# Altium PCB Led_Light_PCB_Ex02.PcbDoc
Units mil, origin at the board's own origin, x right, y up, seen from the top; angles counter-clockwise.
Board outline 1610.59 x 1610.59 mil, 2 copper layers (Top Layer, Bottom Layer); 25 components, 9 nets, 53 pads, 0 vias.
Unrouted connection lines stored in the file: 3.
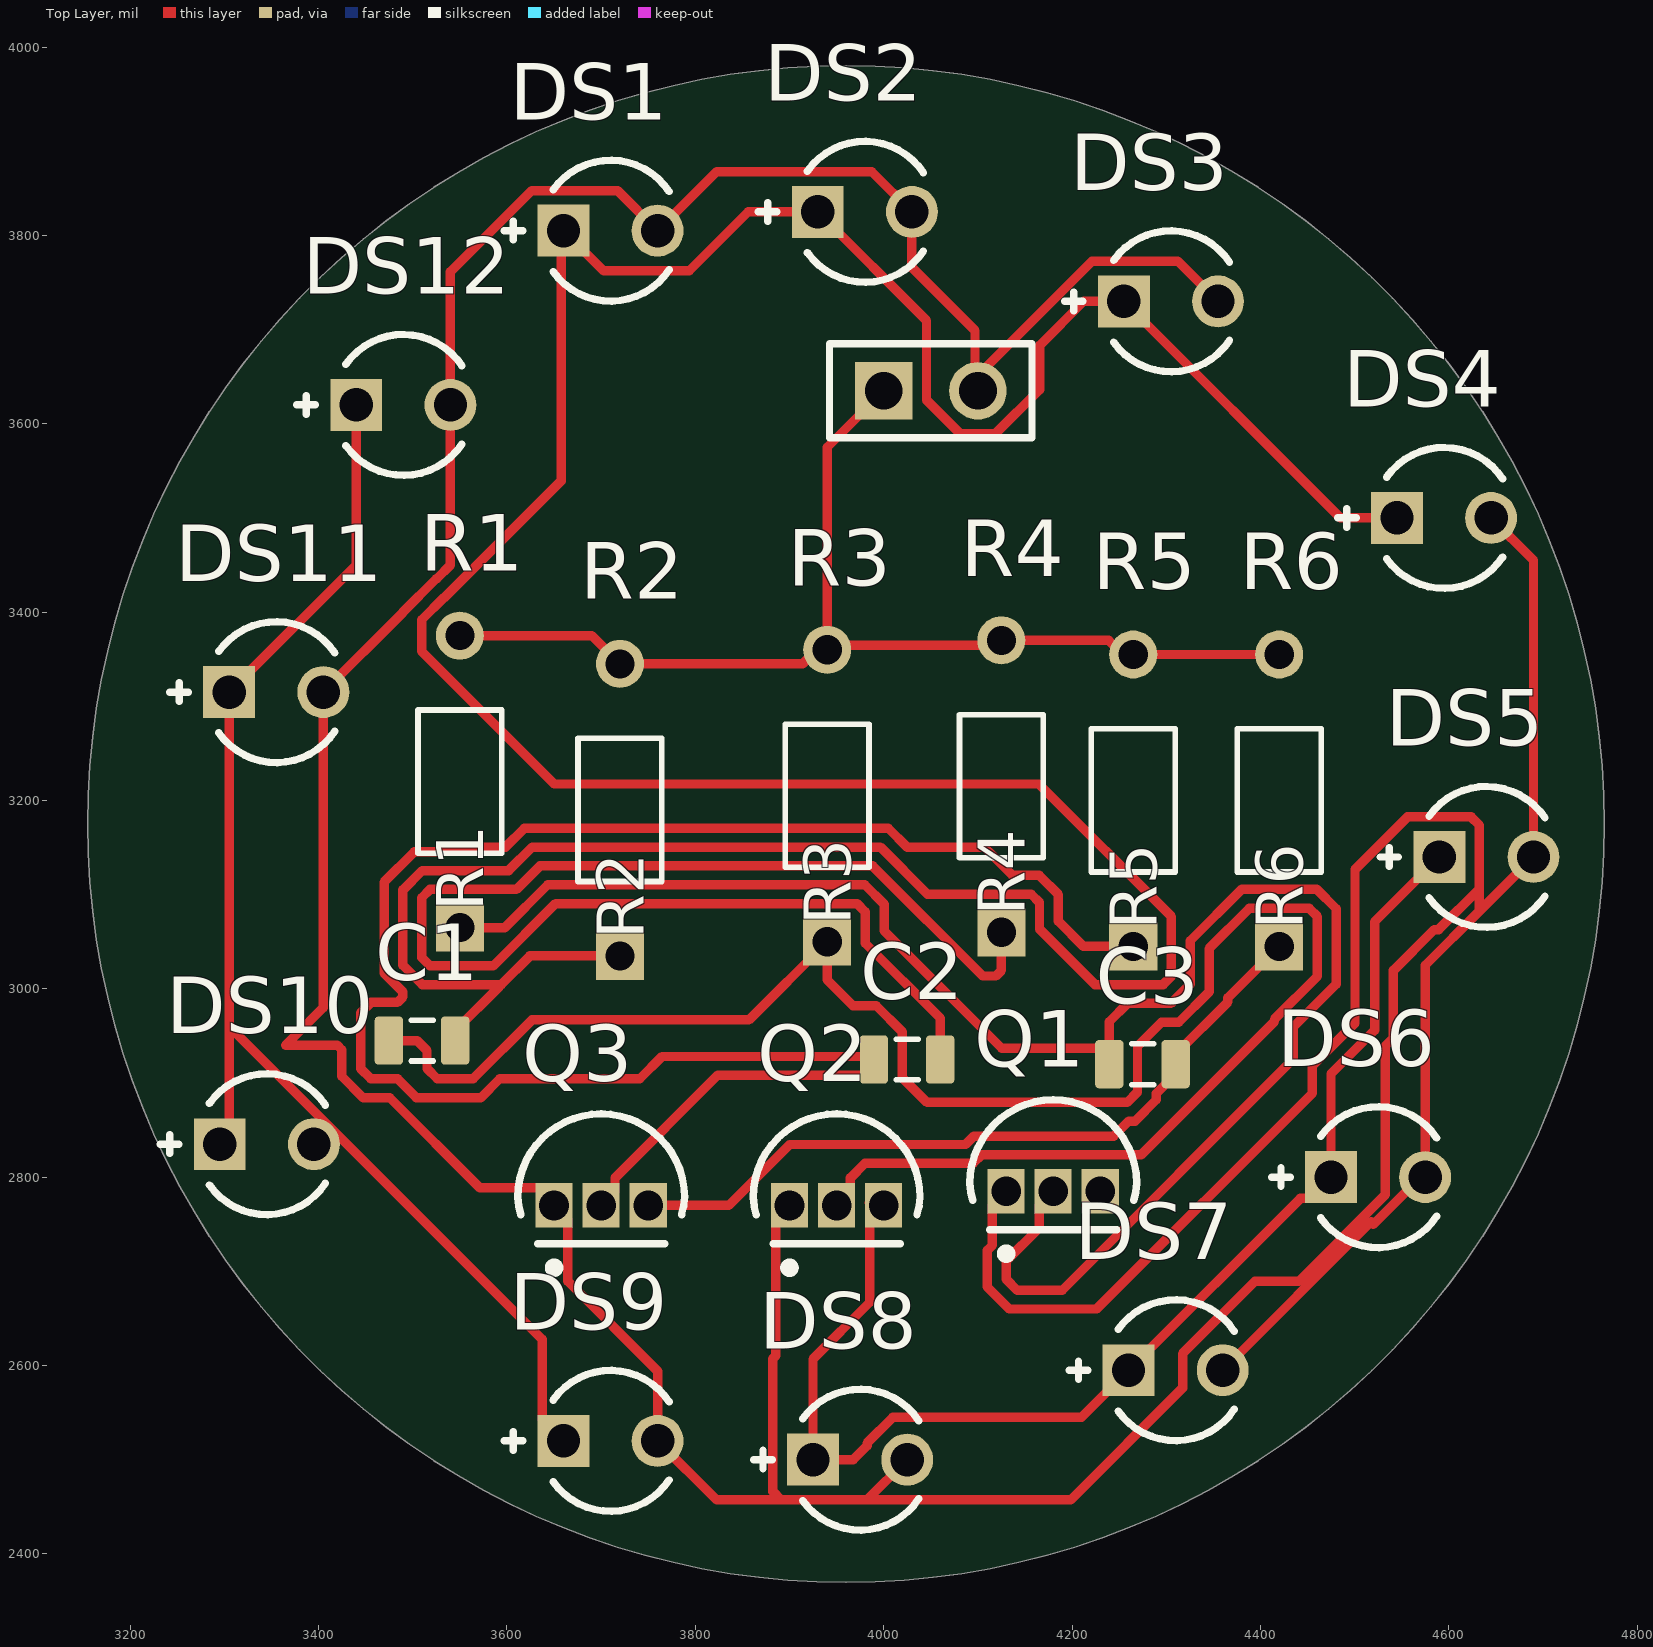
[diagram p0: Top Layer view]
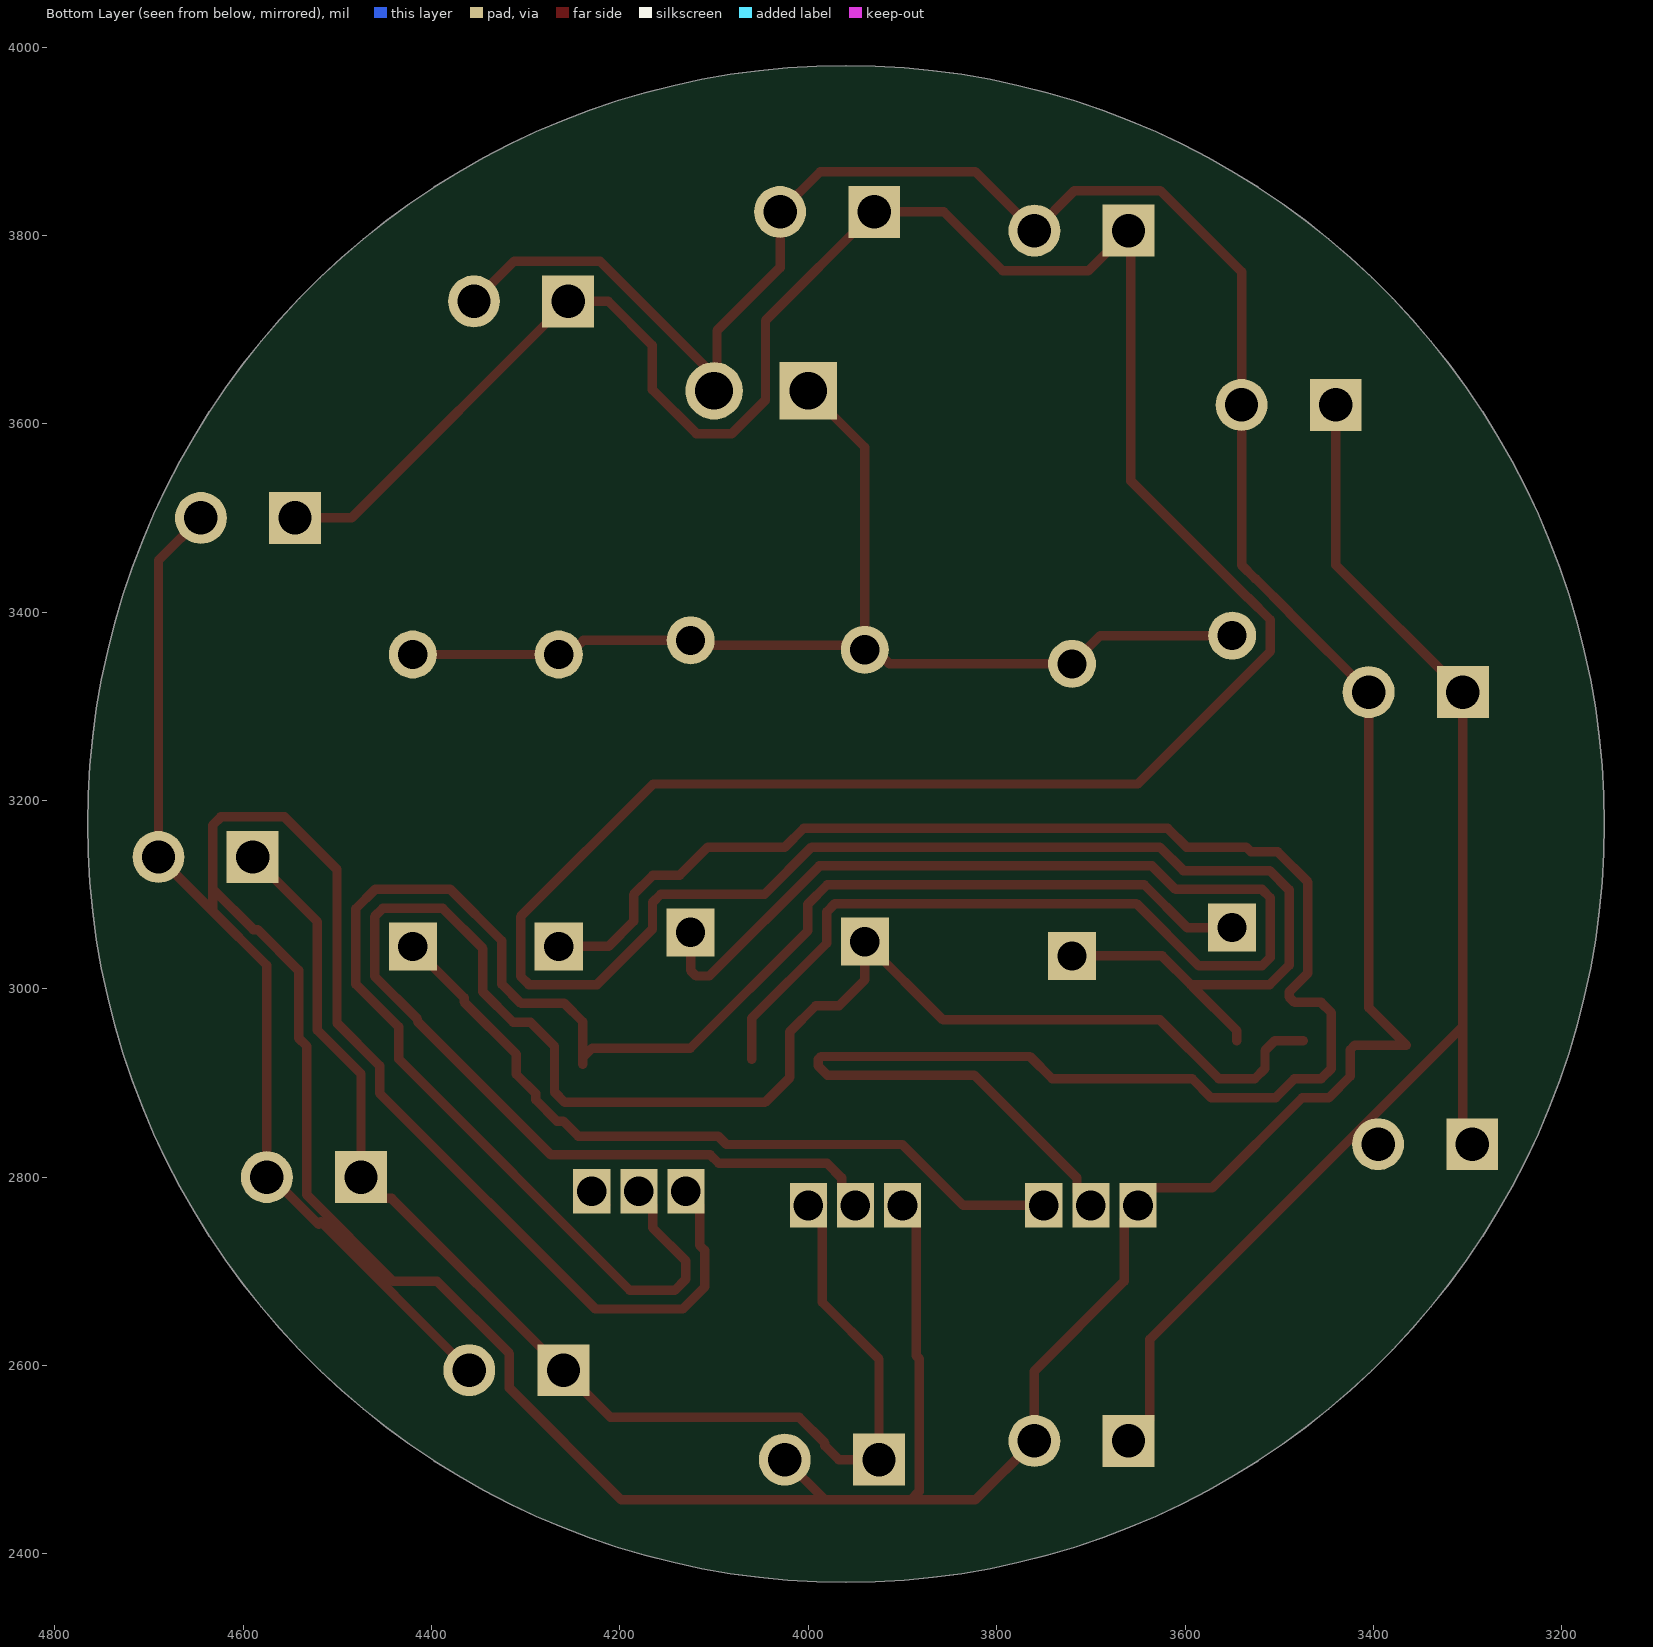
[diagram p1: Bottom Layer view, seen from below]

## Layer stack, top to bottom
Top Solder: solder mask 0.4, Solder Resist, Dk 3.5
Top Layer: signal copper 1.4
Dielectric 1: dielectric 12.6, FR-4, Dk 4.8
Bottom Layer: signal copper 1.4
Bottom Solder: solder mask 0.4, Solder Resist, Dk 3.5

## Board outline
3154.7,3175 ccw(c3960,3175) 3960,2369.7 ccw(c3960,3175) 4765.3,3175 ccw(c3960,3175) 3960,3980.3 ccw(c3960,3175)

## Design rules (kind name [scope] priority, off if disabled: settings)
Clearance [All] p1: gap=10 ignorepadtopadclearanceinfootprint=FALSE
PolygonConnect [All] p1: connectstyle=Relief reliefconductorwidth=10 reliefentries=4 polygonreliefangle="90 Angle" airgapwidth=10
RoutingVias [All] p1: holewidth=28 width=50 viastyle="Through Hole" minholewidth=28 minwidth=50 maxholewidth=28 maxwidth=50
SolderMaskExpansion [All] p1: expansion=0 istentingtop=FALSE
SupplyNets "Schematic Supply Nets" [InNet('GND')] p1: voltage=0.000
Width [All] p1: maxlimit=10 minlimit=10 preferedwidth=10
30 further rules are at their usual default settings.

## Classes and differential pairs
component class "Led Light-Ex01": * C1 C2 C3 DS1 DS2 DS3 DS4 DS5 DS7 DS9 DS10 DS11 DS12 Q1 Q3 R3 R4 R5 R6

## Components (designator, comment, footprint, x,y, rotation, side; value= is the part's Value field where it differs from the comment)
C1 "Capacitor 22µF +/-40% 16V 0805" CAPC0805(2012)145_L 3510,2945 r0 top value=22µF
C2 "Capacitor 22µF +/-40% 16V 0805" CAPC0805(2012)145_L 4025,2925 r0 top value=22µF
C3 "Capacitor 22µF +/-40% 16V 0805" CAPC0805(2012)145_L 4275,2920 r0 top value=22µF
DS1 "LTL-1CHE" INDPR60-254-520X380X650 3710,3805 r0 top
DS2 "LTL-1CHE" INDPR60-254-520X380X650 3980,3825 r0 top
DS3 "LTL-1CHE" INDPR60-254-520X380X650 4305,3730 r0 top
DS4 "LTL-1CHE" INDPR60-254-520X380X650 4595,3500 r0 top
DS5 "LTL-1CHE" INDPR60-254-520X380X650 4640,3140 r0 top
DS6 "LTL-1CHE" INDPR60-254-520X380X650 4525,2800 r0 top
DS7 "LTL-1CHE" INDPR60-254-520X380X650 4310,2595 r0 top
DS8 "LTL-1CHE" INDPR60-254-520X380X650 3975,2500 r0 top
DS9 "LTL-1CHE" INDPR60-254-520X380X650 3710,2520 r0 top
DS10 "LTL-1CHE" INDPR60-254-520X380X650 3345,2835 r0 top
DS11 "LTL-1CHE" INDPR60-254-520X380X650 3355,3315 r0 top
DS12 "LTL-1CHE" INDPR60-254-520X380X650 3490,3620 r0 top
J1 "TSW-102-26-F-S" SMTC-TSW-102-26-XX-S 4000,3635 r0 top
Q1 "S9013" JSCJ-TO-92-3_V 4180,2785 r0 top
Q2 "S9013" JSCJ-TO-92-3_V 3950,2770 r0 top
Q3 "S9013" JSCJ-TO-92-3_V 3700,2770 r0 top
R1 "CF18JT330R" STA_CF18_STP 3550,3065 r90 top value=10k
R2 "CF18JT330R" STA_CF18_STP 3720,3035 r90 top value=330
R3 "CF18JT330R" STA_CF18_STP 3940,3050 r90 top value=10k
R4 "CF18JT330R" STA_CF18_STP 4125,3060 r90 top value=330
R5 "CF18JT330R" STA_CF18_STP 4265,3045 r90 top value=10k
R6 "CF18JT330R" STA_CF18_STP 4420,3045 r90 top value=330

## Footprints (in the part's own frame and the unit in brackets; to place one, negate y for a bottom-side part, rotate by r counter-clockwise, add the part's x,y. Pads: shape width x height; smd on the part's side, far side on the other; paste and mask are expansions set on the pad)
CAPC0805(2012)145_L [mm] "Chip Capacitor, Body 2.0x1.2mm, Height 1.45mm, IPC High Density"
  rrect25% 0.76x1.3 smd: 1(-0.9,0) 2(0.89,0)
  silkscreen extent -0.3,-0.55 0.3,0.55, body extent -1,-0.6 1,0.6, height 1.45
INDPR60-254-520X380X650 [mm] "THD, 2-Leads, Dia 3.8mm, Pitch 2.54mm"
  rect 1.4x1.4 hole 0.9: 1(-1.27,0)
  round 1.4 hole 0.9: 2(1.27,0)
  silkscreen extent -2.87,-1.9 1.58,1.9, body extent -1.9,-1.9 1.9,1.9, height 6.5
JSCJ-TO-92-3_V [mm] "TO-92, 3-leads, Height 4.7mm, Pitch 1.27mm"
  rect 1x1.2 hole 0.8: 1(-1.27,0) 2(0,0) 3(1.27,0)
  silkscreen extent -2.25,-1.81 2.25,2.47, body extent -2.25,-1.03 2.25,2.47, height 4.7
SMTC-TSW-102-26-XX-S [mm] ".025 SQ Post Terminal Strip Assembly, 1x2 Pins, Vertical, 2.54mm Pitch, Male"
  rect 1.55x1.55 hole 1.02: 1(0,0)
  round 1.55 hole 1.02: 2(2.54,0)
  silkscreen extent -1.46,-1.27 4,1.27, body extent -1.4,-1.27 3.81,1.27, height 8.38
STA_CF18_STP [mil]
  rect 51x51 hole 31 paste-99999 mask+0: 1(0,0)
  round 51 hole 31 paste-99999 mask+0: 2(310,0)
  silkscreen extent 79,-44 231,45, body extent -11,-39 321,39, height 79

## Part data
C1 C2 C3: library part CMP-001-00081-4, "Chip Capacitor, 22µF +/-40%, 16V, 0805, Thickness 1.45 mm", Case/Package=0805, Max Operating Temperature=85°C, Min Operating Temperature=-55°C, Tolerance=5%, Voltage Rating=16V, Mounting Technology=SMT, Pins=2
DS1 DS2 DS3 DS4 DS5 DS6 DS7 DS8 DS9 DS10 DS11 DS12: library part CMP-007-00018-2, "LED Uni-Color Red, 100 mW, 30 mA, -55 to 100 degC, 2-Pin THD, RoHS, Bulk", Case/Package=Radial, Colour=Red, Forward Current=20mA, Forward Voltage=2V, Manufacturer=Lite-On, Max Operating Temperature=100°C, Min Operating Temperature=-55°C, Package Description="2-Pin Through Hole Device, Dia 3.8 mm, Pitch 2.54 mm", Package Quantity=1000, Datasheet URL=https://datasheet.ciiva.com/15117/getdatasheetpartid-187746-15117985.pdf, Datasheet Version=Dec-03, Illumination Colour=Red, Lens Style=Dome, Luminous Intensity=12.6mcd, Manufacturer URL=http://www.us.liteon.com/, Mounting Technology=TH, Nominal Vf=2V, Package Reference=LTL-1CHE, Packaging=Bulk, Pins=2, RoHS Compliant=True, Viewing Angle=60degrees
J1: library part CMP-002-00078-1, "Pin Header, Board-to-Board, 2.54 mm, 1 Rows, 2 Contacts, Through Hole, TSW Series", Max Current Rating=7.6A, Max Operating Temperature=125°C, Min Operating Temperature=-55°C, Gender=Male
Q1 Q2 Q3: library part CMP-013-00000-3, "Transistor, NPN, 0.1 uA, 150 MHz, 3-Pin TO-92", Case/Package=TO-92-3, Manufacturer="Jiangsu Changjiang Electronics Technology", Package Description="3-Pin Through Hole Device, Height 4.7 mm, Pitch 2.3 mm", Datasheet URL=http://www.cj-elec.com/txUpfile/20121910315050632.pdf, Datasheet Version="Rev. B, 11/2011", Mounting Technology=TH, Package Reference=TO-92-3, RoHS Compliant=False
R1 R2 R3 R4 R5 R6: library part CMP-009-00178-3, "Fixed Resistor, Carbon Film, 0.125W, 330ohm, 250V, 5% +/-Tol, -400, 0ppm/Cel, Through Hole Mount", Case/Package=Conformal, Max Operating Temperature=155°C, Min Operating Temperature=-55°C, Tolerance=5%, Mounting Technology="Axial, Through Hole"

## Nets (pads, with @x,y where several pads share a name; then routed paths per layer and width w, separated by ;. In a path a pad name is that pad's centre, name@x,y a point inside that pad or via, vN(x,y) a via of type N, cw(c..) or ccw(c..) an arc to the next point about the centre after c; other vN are vias at no path point)
GND: DS1.2 DS2.2 DS3.2 DS4.2 DS5.2 DS6.2 DS7.2 DS8.2 DS9.2 DS10.2 DS11.2 DS12.2 J1.2 Q1.1 Q2.1 Q3.1 | length 6553.8
  Top Layer w10: DS10.2@3375,2830 DS10.2@3380,2825 ; Q2.1 3885.31,2755.31 3885.31,2610.24 3882.44,2607.37 3882.44,2466.23 3891.23,2457.44 ; DS8.2 3982.44,2457.44 ; Q1.1 4115.31,2770.31 4115.31,2727.56 4110,2722.25 4110,2683.43 4133.43,2660 4226.09,2660 4455,2888.91 4455,2918.12 4500.5,2963.62 4500.5,3126.83 4556.23,3182.56 4623.77,3182.56 4632.56,3173.77 4632.56,3106.23 ; DS3.2 4312.44,3772.56 4221.23,3772.56 4109.76,3661.09 4109.76,3644.76 J1.2 4096.94,3638.06 4096.94,3698.85 4030,3765.8 DS2.2 3987.44,3867.56 3822.56,3867.56 DS1.2 3717.44,3847.56 3626.23,3847.56 3540,3761.33 DS12.2 3540,3450 3525.5,3435.5 3524.94,3435.5 3489.5,3400.06 3489.5,3399.5 DS11.2 3405,2980 3365,2940 3419.99,2940 3424.61,2935.39 3424.61,2907.1 3447.3,2884.41 3475.58,2884.41 3571.37,2788.62 3635.31,2788.62 3650,2773.94 Q3.1 3664.69,2755.31 3664.69,2689.45 3760,2594.14 DS9.2 3822.56,2457.44 3891.23,2457.44 ; DS7.2 4517.56,2752.56 ; 4520.06,2750.06 4570,2800 DS6.2 4575,3025 4632.56,3082.56 ; DS4.2 4690,3455 DS5.2 4632.56,3082.56 ; 3891.23,2457.44 3982.44,2457.44 ; 3982.44,2457.44 4198.77,2457.44 4317.44,2576.11 4317.44,2612.63 4394.24,2689.43 4440.76,2689.43 4532.44,2781.11 4532.44,2938.99 4541.22,2947.77 4541.22,3019.5 4584.58,3062.87 4589.2,3062.87 4632.56,3106.23 ; 4632.56,3082.56 4632.56,3106.23
NetC1_1: C1.1 Q2.2 R3.1 | length 2026.2
  Top Layer w10: C1.1 3504.53,2945 3515.08,2934.45 3515.08,2915.39 3526.06,2904.41 3564.02,2904.41 3626.57,2966.95 3856.95,2966.95 R3.1 3940,3009.5 3967.44,2982.06 3992.08,2982.06 4019.53,2954.61 4019.53,2905.94 4046.06,2879.41 4258.55,2879.41 4269.53,2890.39 4269.53,2939.06 4294.97,2964.5 4313.28,2964.5 4345.5,2996.72 4345.5,3042.71 4388.29,3085.5 4451.71,3085.5 4460.5,3076.71 4460.5,3013.29 4415,2967.79 4415,2965.39 4273.23,2823.62 4104.1,2823.62 4095.18,2814.7 3980.18,2814.7 3964.69,2799.21 3964.69,2784.69 Q2.2
NetC1_2: C1.2 DS1.1 DS2.1 DS3.1 DS4.1 Q1.3 R2.1 | length 4086.8
  Top Layer w10: C1.2 3545.04,2955.63 3591.95,3002.54 ; R2.1 3624.41,3035 3593.91,3004.5 3510,3004.5 3489.5,3025 3489.5,3105 3510,3125.5 3601.77,3125.5 3626.77,3150.5 3996.57,3150.5 4046.57,3100.5 4156.71,3100.5 4165.5,3091.71 4165.5,3063.43 4224.43,3004.5 4296.71,3004.5 4305.5,3013.29 4305.5,3076.71 4164.74,3217.47 3650.26,3217.47 3509.5,3358.22 3509.5,3391.78 3533.22,3415.5 3533.78,3415.5 3657.5,3539.22 3657.5,3802.5 DS1.1 3702.56,3762.44 3793.63,3762.44 3856.19,3825 DS2.1 4045.51,3709.49 4045.51,3625.12 4081.15,3589.49 4118.85,3589.49 4165.65,3636.28 4165.65,3683.21 4212.44,3730 DS3.1 4485,3500 DS4.1 ; Q1.3@4215.31,2770.31 Q1.3
NetC2_1: C2.1 Q3.2 R5.1 | length 2072.5
  Top Layer w10: Q3.2 3714.69,2784.69 3714.69,2799.21 3823.63,2908.15 3979.61,2908.15 3989.57,2918.11 C2.1 3986.42,2928.15 3764.7,2928.15 3740.96,2904.41 3592.31,2904.41 3572.31,2884.41 3503.87,2884.41 3483.87,2904.41 3455.58,2904.41 3444.61,2915.39 3444.61,2974.61 3455.58,2985.59 3483.64,2985.59 3489.5,2991.45 3489.5,2996.72 3469.5,3016.72 3469.5,3113.28 3501.72,3145.5 3530,3145.5 3535,3150.5 3598.49,3150.5 3618.49,3170.5 4004.85,3170.5 4024.85,3150.5 4106.71,3150.5 4136.71,3120.5 4165,3120.5 4185.5,3100 4185.5,3071.71 4212.21,3045 R5.1
NetC2_2: C2.2 DS5.1 DS6.1 DS7.1 DS8.1 Q2.3 R4.1 | length 2860.6
  Top Layer w10: Q2.3@3984.69,2772.95 3997.05,2772.95 Q2.3 3985.31,2755.31 3985.31,2667.13 3925,2606.81 DS8.1 3967.56,2500 3982.44,2514.88 3982.44,2517.63 4009.85,2545.03 4210.03,2545.03 DS7.1 4442.44,2777.44 4452.44,2777.44 DS6.1 4475,2909.83 4521.22,2956.05 4521.22,3071.22 DS5.1 ; C2.2 4060.04,2968.9 3980.5,3048.44 3980.5,3081.71 3971.71,3090.5 3651.63,3090.5 3585.63,3024.5 3518.29,3024.5 3509.5,3033.29 3509.5,3096.71 3518.29,3105.5 3610.06,3105.5 3635.06,3130.5 3988.28,3130.5 4105.14,3013.64 4119.14,3013.64 4125,3019.5 R4.1
NetC3_1: C3.1 Q1.2 R1.1 | length 1884.5
  Top Layer w10: R1.1 3597.84,3065 3643.34,3110.5 3980,3110.5 4000.5,3090 4000.5,3061.71 4125.36,2936.85 4229.61,2936.85 C3.1@4239.57,2926.89 ; Q1.2 4165.31,2770.31 4165.31,2746.38 4130,2711.06 4130,2691.72 4141.72,2680 4189.52,2680 4435,2925.48 4435,2959.5 4480.5,3005 4480.5,3085 4460,3105.5 4380,3105.5 4325.5,3051 4325.5,3005 4305,2984.5 4259,2984.5 4239.57,2965.06 C3.1@4239.57,2926.89 ; C3.1 C3.1@4239.57,2926.89
NetC3_2: C3.2 Q3.3 R6.1 | length 802.9
  Top Layer w10: Q3.3 3835.48,2770 3900.18,2834.7 4086.9,2834.7 4095.82,2843.62 4244.29,2843.62 4260.08,2859.41 4266.83,2859.41 4289.53,2882.1 4289.53,2888.86 4310.04,2909.37 4310.04,2930.63 4365.5,2986.09 4365.5,2990.5 R6.1
NetDS9_1: DS9.1 DS10.1 DS11.1 DS12.1 | length 1432.3
  Top Layer w10: DS10.1 3305,2845 DS11.1 3440,3450 DS12.1 ; 3305,2960.19 3637.44,2627.75 3637.44,2542.56 DS9.1
NetJ1_1: J1.1 R1.2 R2.2 R3.2 R4.2 R5.2 R6.2 | length 1198.8
  Top Layer w10: R1.2 3690,3375 R2.2 3913.91,3345 3928.91,3360 R3.2 ; J1.1 3940,3575 R3.2 ; R6.2 R5.2 4253.91,3355 4238.91,3370 R4.2 4120,3365 3945,3365 R3.2

## Silkscreen, mask and mechanical layers (free items; w line width, h text height)
Mechanical 1:
  circle w10: c3960,3175 r805.29